# Altium PCB FMC_Test_Module.PcbDoc (part 2 of 2)
Units mm, origin at the board's own origin, x right, y up, seen from the top; angles counter-clockwise.
Board outline 34.9 x 69 mm, 4 copper layers (Top Layer, Int1 (GND), Int2 (PWR), Bottom Layer), stack 1.508 mm thick; 11 components, 88 nets, 527 pads, 220 vias.
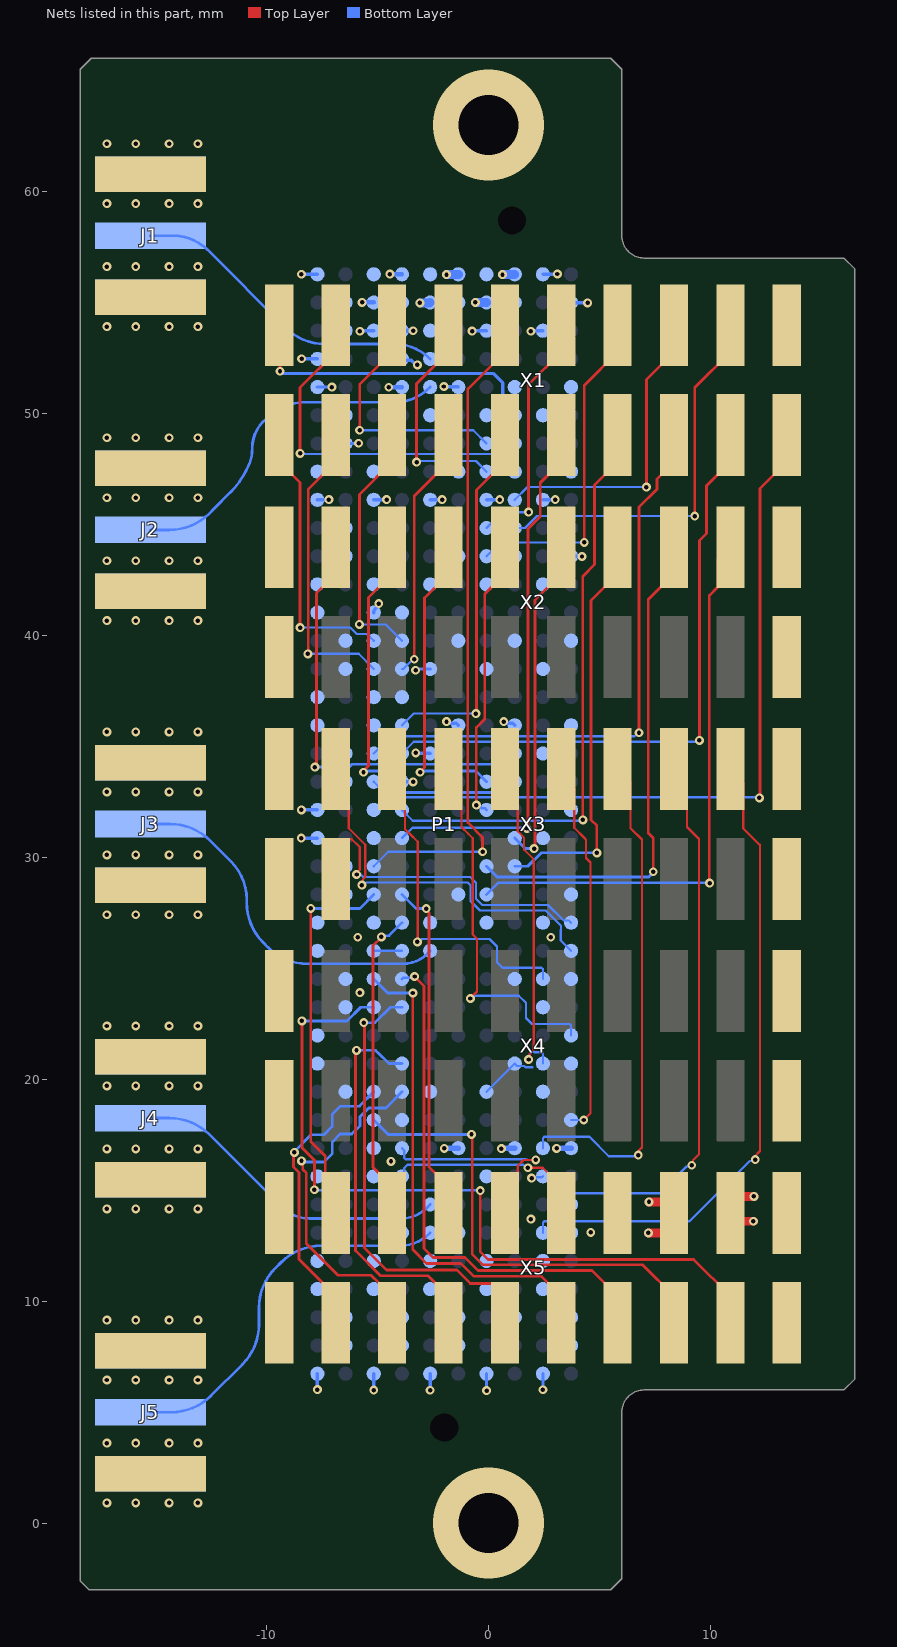
[diagram p4: the nets of this part, all layers, seen from the top]

## Via types
v1: diameter 0.4, hole 0.2, Top Layer to Bottom Layer, tented both sides, 218 vias
v2: diameter 5, hole 2.7, Top Layer to Bottom Layer, 2 vias

## Nets (pads, with @x,y where several pads share a name; then routed paths per layer and width w, separated by ;. In a path a pad name is that pad's centre, name@x,y a point inside that pad or via, vN(x,y) a via of type N, cw(c..) or ccw(c..) an arc to the next point about the centre after c; other vN are vias at no path point) (continued)
CON2_GP_D_N7: P1.K17 X3.18 | length 16.2
  Top Layer w0.1: X3.18@-6.89,29.025 X3.18@-6.725,29.19 ; v1(-5.947,29.226) -5.947,29.299 -5.811,29.435 -5.811,30.461 -6.164,30.813 -6.305,30.813 -6.325,30.793 X3.18@-6.325,30.359 ; X3.18@-6.725,29.19 -6.325,29.59 X3.18@-6.325,30.359 ; X3.18@-6.725,29.19 -6.329,30.346 X3.18@-6.325,30.359
  Bottom Layer w0.1: v1(-5.947,29.226) -5.943,29.23 -5.766,29.23 -5.646,29.11 -0.835,29.11 -0.565,28.84 -0.565,28.13 -0.505,28.07 -0.288,27.853 2.675,27.853 3.37,27.158 3.612,27.158 P1.K17@3.715,27.055
CON2_GP_D_P0: P1.J6 X3.3 | length 29.5
  Top Layer w0.1: X3.3@10.89,33.975 11.475,33.39 11.475,31.3 12.152,30.623 12.225,30.55 12.225,16.771 11.963,16.509 12.01,16.462 v1(12.01,16.379)
  Bottom Layer w0.1: P1.J6@2.445,13.085 2.445,13.541 2.504,13.6 7.177,13.6 9.054,13.6 11.775,16.322 11.952,16.322 v1(12.01,16.379)
CON2_GP_D_P1: P1.K7 X3.5 | length 24.9
  Top Layer w0.1: X3.5@8.35,33.975 8.935,33.39 8.935,31.369 9.481,30.823 9.481,16.623 9.207,16.349 9.207,16.182 v1(9.15,16.125)
  Bottom Layer w0.1: P1.K7@3.715,14.355 3.715,14.806 3.774,14.865 7.704,14.865 8.91,16.07 9.095,16.07 v1(9.15,16.125)
CON2_GP_D_P2: P1.J9 X3.7 | length 23.1
  Top Layer w0.1: X3.7@5.81,33.975 6.395,33.39 6.395,31.311 6.908,30.798 6.908,16.929 6.777,16.799 6.777,16.622 v1(6.739,16.583)
  Bottom Layer w0.1: P1.J9@2.445,16.895 2.445,17.346 2.504,17.405 4.54,17.405 5.41,16.535 6.69,16.535 v1(6.739,16.583)
CON2_GP_D_P3: P1.K10 X3.9 | length 17.1
  Top Layer w0.1: X3.9@3.27,33.975 3.855,33.39 3.855,31.327 4.315,30.867 4.388,30.793 4.388,29.965 4.59,29.764 4.59,18.47 v1(4.285,18.165)
  Bottom Layer w0.1: P1.K10@3.715,18.165 v1(4.285,18.165)
CON2_GP_D_P4: P1.J12 X3.11 | length 15.1
  Top Layer w0.1: X3.11@0.73,33.975 1.315,33.39 1.315,31.169 1.598,30.885 1.598,30.343 2.035,29.906 2.035,21.353 1.854,21.173 1.854,20.946 v1(1.8,20.891)
  Bottom Layer w0.1: v1(1.8,20.891) 1.855,20.946 1.855,21.13 1.948,21.223 2.067,21.223 2.075,21.215 2.386,21.215 2.445,21.156 P1.J12@2.445,20.705
CON2_GP_D_P5: P1.K13 X3.13 | length 17
  Top Layer w0.1: X3.13@-1.81,33.975 -1.225,33.39 -1.225,31.367 -0.923,31.065 -0.713,30.855 -0.713,26.518 -0.525,26.329 -0.525,23.957 -0.824,23.657 v1(-0.824,23.638)
  Bottom Layer w0.1: v1(-0.824,23.638) -0.743,23.638 -0.619,23.761 1.36,23.761 1.68,23.441 1.68,22.76 1.955,22.485 3.656,22.485 3.715,22.426 P1.K13@3.715,21.975
CON2_GP_D_P6: P1.J15 X3.15 | length 15.4
  Top Layer w0.1: X3.15@-4.35,33.975 -3.765,33.39 -3.765,31.27 -3.52,31.025 -3.192,30.696 -3.192,26.206 v1(-3.21,26.187)
  Bottom Layer w0.1: v1(-3.21,26.187) -3.135,26.187 -3.002,26.321 0.034,26.321 0.375,25.98 0.375,25.59 0.375,25.271 0.621,25.025 2.386,25.025 2.445,24.966 P1.J15@2.445,24.515
CON2_GP_D_P7: P1.K16 X3.17 | length 17.2
  Top Layer w0.1: X3.17@-6.89,33.975 -6.305,33.39 -6.305,31.308 -5.561,30.564 -5.561,29.117 -5.655,29.023 -5.655,28.805 v1(-5.711,28.748)
  Bottom Layer w0.1: -5.518,28.86 -0.939,28.86 -0.815,28.736 -0.815,28.027 -0.392,27.603 2.571,27.603 3.255,26.92 3.255,26.733 3.248,26.726 3.248,26.252 P1.K16@3.715,25.785
CON2_GP_S0: P1.G18 X2.3 | length 25.8
  Top Layer w0.125: v1(9.955,28.839) 9.943,28.851 9.943,41.793 10.318,42.168 10.318,43.403 X2.3@10.89,43.975
  Bottom Layer w0.125: P1.G18@-0.095,28.325 0.43,28.85 9.944,28.85 v1(9.955,28.839)
CON2_GP_S1: P1.G19 X2.5 | length 23.1
  Top Layer w0.125: v1(7.415,29.35) 7.415,30.87 7.188,31.097 7.188,41.608 8.35,42.77 X2.5@8.35,43.975
  Bottom Layer w0.125: P1.G19@-0.095,29.595 0.387,29.112 7.212,29.112 7.415,29.315 v1(7.415,29.35) v1@7.45,29.35
CON2_GP_S2: P1.H19 X2.7 | length 18.3
  Top Layer w0.125: v1(4.875,30.2) 4.875,31.425 4.612,31.688 4.612,41.572 5.81,42.77 X2.7@5.81,43.975
  Bottom Layer w0.125: P1.H19@1.175,29.595 1.763,29.595 2.368,30.2 v1(4.875,30.2)
CON2_GP_S3: P1.H20 X2.9 | length 15.2
  Top Layer w0.125: v1(2.046,30.391) 2.088,30.433 2.088,41.588 3.27,42.77 X2.9@3.27,43.975
  Bottom Layer w0.125: P1.H20@1.175,30.865 1.649,30.391 v1(2.046,30.391)
CON2_GP_S4: P1.G21 X2.11 | length 12.7
  Top Layer w0.125: v1(-0.554,32.351) -0.554,35.853 -0.176,36.231 -0.176,41.864 0.73,42.77 X2.11@0.73,43.975
  Bottom Layer w0.125: v1(-0.554,32.351) -0.502,32.299 -0.398,32.299 -0.312,32.213 -0.173,32.213 P1.G21@-0.095,32.135
CON2_GP_S5: P1.G22 X2.13 | length 13.9
  Top Layer w0.125: v1(-3.086,33.83) -3.086,33.844 -2.889,34.041 -2.889,41.691 -1.81,42.77 X2.13@-1.81,43.975
  Bottom Layer w0.125: v1(-3.086,33.83) -3.012,33.83 -2.955,33.887 -0.578,33.887 P1.G22@-0.095,33.405
CON2_GP_S6: P1.H22 X2.15 | length 18.3
  Top Layer w0.125: v1(-5.638,33.83) -5.638,33.904 -5.417,34.126 -5.417,41.703 -4.35,42.77 X2.15@-4.35,43.975
  Bottom Layer w0.125: v1(-5.638,33.83) -5.586,33.882 -5.43,33.882 -5.427,33.885 -5.377,33.885 -5.375,33.887 -4.868,33.887 -4.56,33.579 -4.56,33.195 -4.285,32.92 0.69,32.92 P1.H22@1.175,33.405
CON2_GP_S7: P1.H23 X2.17 | length 19.6
  Top Layer w0.125: v1(-7.825,34.065) -7.772,34.117 -7.772,34.261 -7.758,34.276 -7.758,41.902 -6.89,42.77 X2.17@-6.89,43.975
  Bottom Layer w0.125: v1(-7.825,34.065) -6.277,34.065 -6.15,34.192 0.692,34.192 P1.H23@1.175,34.675
CON_I2S_CLK: P1.G33 X1.13 | length 10.1
  Top Layer w0.125: v1(-3.245,47.808) -3.245,51.335 -1.81,52.77 X1.13@-1.81,53.975
  Bottom Layer w0.1: v1(-3.245,47.808) -3.202,47.85 -0.57,47.85 P1.G33@-0.095,47.375
CON_I2S_IN: P1.H34 X1.17 | length 16.3
  Top Layer w0.125: v1(-8.495,48.194) -8.5,48.199 -8.5,51.16 -6.89,52.77 X1.17@-6.89,53.975
  Bottom Layer w0.1: v1@-8.476,48.175 0.705,48.175 1.12,48.59 1.12,48.645 P1.H34@1.175,48.645
CON_I2S_OUT: P1.H35 X1.19 | length 14
  Top Layer w0.15: X1.19@-9.43,53.975 -9.4,53.945 v1(-9.4,51.9)
  Bottom Layer w0.15: v1(-9.4,51.9) -9.3,51.8 0.199,51.8 0.631,51.369 0.631,50.459 P1.H35@1.175,49.915
CON_I2S_WS: P1.G34 X1.15 | length 11.3
  Top Layer w0.125: v1(-5.812,49.238) -5.812,51.308 -4.35,52.77 X1.15@-4.35,53.975
  Bottom Layer w0.1: v1(-5.812,49.238) -0.688,49.238 P1.G34@-0.095,48.645
FMC_3V3: P1.C39 P1.D36 P1.D38 P1.D40 X5.5 | length 5.3
  Top Layer w0.4: v1(7.2,13.075) 7.915,13.075 8.35,13.51 X5.5@8.35,13.975 8.35,14.04 7.915,14.475 v1(7.225,14.475)
  Bottom Layer w0.2: v1(-5.7,55) -5.697,54.997 -5.178,54.997 P1.C39@-5.175,54.995 ; v1(-4.5,51.175) -4.495,51.18 -3.91,51.18 P1.D36@-3.905,51.185 ; v1(-4.45,56.275) -4.445,56.27 -3.91,56.27 P1.D40@-3.905,56.265 ; P1.D38@-3.905,53.725 v1(-3.4,53.725)
FMC_ADJ: P1.E39 P1.F40 P1.G39 P1.H40 X5.3 | length 4.8
  Top Layer w0.4: v1(11.925,13.6) 11.265,13.6 X5.3@10.89,13.975 10.89,14.29 11.325,14.725 v1(11.95,14.725)
  Bottom Layer w0.4: v1(-3.1,54.975) -2.655,54.975 P1.E39@-2.635,54.995 ; v1(-1.9,56.25) -1.38,56.25 P1.F40@-1.365,56.265 ; v1(-0.6,55) -0.1,55 P1.G39@-0.095,54.995 ; v1(0.625,56.25) 1.16,56.25 P1.H40@1.175,56.265
GND: J1.2 J1.3 J1.4 J1.5 J2.2 J2.3 J2.4 J2.5 J3.2 J3.3 J3.4 J3.5 J4.2 J4.3 J4.4 J4.5 J5.2 J5.3 J5.4 J5.5 P1.A1 P1.A4 P1.A5 P1.A8 P1.A12 P1.A13 P1.A16 P1.A17 P1.A20 P1.A21 P1.A24 P1.A25 P1.A28 P1.A29 P1.A32 P1.A33 P1.A36 P1.A37 P1.A40 P1.B2 P1.B3 P1.B11 P1.B14 P1.B15 P1.B18 P1.B19 P1.B22 P1.B23 P1.B26 P1.B27 P1.B30 P1.B31 P1.B34 P1.B35 P1.B38 P1.B39 P1.C1 P1.C4 P1.C5 P1.C8 P1.C9 P1.C16 P1.C17 P1.C20 P1.C21 P1.C24 P1.C25 P1.C28 P1.C29 P1.C32 P1.C33 P1.C38 P1.C40 P1.D2 P1.D3 P1.D6 P1.D10 P1.D16 P1.D22 P1.D25 P1.D28 P1.D37 P1.D39 P1.E1 P1.E4 P1.E5 P1.E11 P1.E17 P1.E23 P1.E26 P1.E29 P1.E32 P1.E35 P1.E38 P1.E40 P1.F2 P1.F3 P1.F6 P1.F9 P1.F18 P1.F24 P1.F27 P1.F30 P1.F33 P1.F36 P1.F39 P1.G1 P1.G4 P1.G5 P1.G8 P1.G11 P1.G17 P1.G26 P1.G29 P1.G32 P1.G35 P1.G38 P1.G40 P1.H3 P1.H9 P1.H12 P1.H15 P1.H24 P1.H27 P1.H30 P1.H33 P1.H36 P1.H39 P1.J1 P1.J4 P1.J5 P1.J8 P1.J11 P1.J14 P1.J17 P1.J20 P1.J23 P1.J26 P1.J29 P1.J32 P1.J35 P1.J38 P1.J40 P1.K2 P1.K3 P1.K6 P1.K9 P1.K12 P1.K15 P1.K18 P1.K21 P1.K24 P1.K27 P1.K30 P1.K33 P1.K36 P1.K39 X1.1 X2.1 X2.2 X2.19 X2.20 X3.1 X3.2 X3.19 X3.20 X4.1 X4.2 X4.19 X4.20 X5.1 X5.2 X5.7 X5.19 X5.20 | length 26.3
  Bottom Layer w0.1: P1.C16@-5.175,25.785 P1.D16@-3.905,25.785 ; P1.G11@-0.095,19.435 P1.H12@1.175,20.705 1.278,20.602 1.594,20.602 1.655,20.541 1.97,20.541 1.975,20.545 ; v1@1.896,15.5 v1(1.939,15.543) 1.98,15.584 2.404,15.584 P1.J8@2.445,15.625
  Bottom Layer w0.15: v1(-8.441,30.865) P1.A20@-7.715,30.865 ; v1@-8.439,56.266 P1.A40@-7.716,56.266 ; v1(-8.435,32.135) P1.A21@-7.715,32.135 ; v1(-8.428,52.46) -8.425,52.457 -7.717,52.457 P1.A37@-7.715,52.455 ; v1(-7.715,6.015) P1.A1@-7.715,6.735 ; P1.A32@-7.715,46.105 -7.205,46.105 -7.2,46.1 v1(-7.2,46.115) ; P1.A36@-7.715,51.185 v1(-7.065,51.185) v1@-7.015,51.185 ; P1.B34@-6.445,48.645 -5.883,48.645 ccw(c-5.883,48.681) v1(-5.858,48.656) ; v1(-5.8,53.7) cw(c-5.74,53.64) -5.74,53.725 P1.C38@-5.175,53.725 ; v1(-5.175,5.997) P1.C1@-5.175,6.735 ; P1.C28@-5.175,41.025 cw(c-4.934,41.025) -5.104,41.196 -4.9,41.4 -4.922,41.4 v1(-4.954,41.432) ; P1.C32@-5.175,46.105 -4.605,46.105 -4.6,46.1 v1(-4.6,46.115) ; P1.D22@-3.905,33.405 -3.903,33.402 -3.403,33.402 v1(-3.4,33.4) ; P1.D37@-3.905,52.455 -3.846,52.396 -3.493,52.396 -3.278,52.181 v1(-3.21,52.181) ; v1(-3.288,38.429) -3.319,38.461 -3.351,38.461 cw(c-3.293,38.403) -3.293,38.485 P1.E26@-2.635,38.485 ; v1(-3.286,34.701) -3.273,34.688 -2.648,34.688 P1.E23@-2.635,34.675 ; v1(-2.635,5.988) P1.E1@-2.635,6.735 ; P1.E32@-2.635,46.105 -2.105,46.105 -2.1,46.1 v1(-2.1,46.115) ; v1(-2.015,51.211) -2.002,51.198 -1.378,51.198 P1.F36@-1.365,51.185 ; v1(-1.9,36.115) -1.832,36.115 -1.756,36.039 -1.459,36.039 P1.F24@-1.365,35.945 ; v1(-0.743,53.708) -0.734,53.717 -0.103,53.717 P1.G38@-0.095,53.725 ; v1(-0.095,5.971) P1.G1@-0.095,6.735 ; P1.G32@-0.095,46.105 0.495,46.105 0.5,46.1 v1(0.5,46.115) ; v1(0.678,36.115) 0.746,36.115 0.822,36.039 1.081,36.039 P1.H24@1.175,35.945 ; v1(1.9,53.7) cw(c1.96,53.64) 1.96,53.725 P1.J38@2.445,53.725 ; v1(2.445,6.009) P1.J1@2.445,6.735 ; P1.J32@2.445,46.105 2.995,46.105 3,46.1 v1(3,46.115) ; P1.J40@2.445,56.265 2.453,56.273 3.088,56.273 v1(3.095,56.28) ; v1(2.8,26.4) v1@2.9,26.5 ; P1.K30@3.715,43.565 3.79,43.49 3.858,43.558 4.198,43.558 v1(4.205,43.551) ; P1.K39@3.715,54.995 3.722,54.988 4.45,54.988 v1(4.457,54.981)
  Bottom Layer w0.25: v1(-2,16.885) -2,16.895 P1.F9@-1.365,16.895 ; v1(0.572,16.873) 0.572,16.895 P1.H9@1.175,16.895 ; v1(3.065,16.885) 3.075,16.895 P1.K9@3.715,16.895
  other v1: -17.2,0.91 -15.9,0.91 -14.4,0.91 -13.1,0.91 -17.2,3.61 -15.9,3.61 -14.4,3.61 -13.1,3.61 -17.2,6.45 -15.9,6.45 -14.4,6.45 -13.1,6.45 -17.2,9.15 -15.9,9.15 -14.4,9.15 -13.1,9.15 4.6,13.1 1.9,13.7 -17.2,14.16 -15.9,14.16 -14.4,14.16 -13.1,14.16 -4.4,16.3 -17.2,16.86 -15.9,16.86 -14.4,16.86 -13.1,16.86 -17.2,19.7 -15.9,19.7 -14.4,19.7 -13.1,19.7 -17.2,22.4 -15.9,22.4 -14.4,22.4 -13.1,22.4 -5.8,23.9 -5.9,26.4 -17.2,27.41 -15.9,27.41 -14.4,27.41 -13.1,27.41 -17.2,30.11 -15.9,30.11 -14.4,30.11 -13.1,30.11 -17.2,32.95 -15.9,32.95 -14.4,32.95 -13.1,32.95 -17.2,35.65 -15.9,35.65 -14.4,35.65 -13.1,35.65 -17.2,40.66 -15.9,40.66 -14.4,40.66 -13.1,40.66 -17.2,43.36 -15.9,43.36 -14.4,43.36 -13.1,43.36 -17.2,46.2 -15.9,46.2 -14.4,46.2 -13.1,46.2 -17.2,48.9 -15.9,48.9 -14.4,48.9 -13.1,48.9 -17.2,53.91 -15.9,53.91 -14.4,53.91 -13.1,53.91 -8.44,56.266 -17.2,56.61 -15.9,56.61 -14.4,56.61 -13.1,56.61 -17.2,59.45 -15.9,59.45 -14.4,59.45 -13.1,59.45 -17.2,62.15 -15.9,62.15 -14.4,62.15 -13.1,62.15
  other v2: 0,0 0,63
HYPER_CK_N: P1.D9 X5.11 | length 9.7
  Top Layer w0.1: X5.11@0.73,13.975 1.315,14.56 1.315,16.107 1.574,16.366 v1(2.121,16.366)
  Bottom Layer w0.1: P1.D9@-3.905,16.895 -3.802,16.792 -3.802,16.452 -3.743,16.394 -3.719,16.394 1.663,16.394 1.688,16.369 1.735,16.369 1.737,16.366 v1(2.121,16.366)
HYPER_CK_P: P1.D8 X5.9 | length 10
  Top Layer w0.1: v1(1.768,16.013) 2.437,16.013 3.27,15.18 X5.9@3.27,13.975 X5.9@2.685,14.56
  Bottom Layer w0.1: P1.D8@-3.905,15.625 -3.802,15.728 -3.802,16.003 -3.661,16.144 1.559,16.144 1.69,16.013 v1(1.768,16.013)
HYPER_CSN0: P1.D18 X5.13 | length 15.5
  Top Layer w0.125: v1(-2.811,27.692) -2.811,27.635 -2.685,27.509 -2.685,16.055 -1.81,15.18 X5.13@-1.81,13.975
  Bottom Layer w0.125: P1.D18@-3.905,28.325 -3.272,27.692 v1(-2.811,27.692)
HYPER_CSN1: P1.D17 X5.15 | length 14.1
  Top Layer w0.125: v1(-4.83,26.416) -4.83,26.395 -5.208,26.017 -5.208,16.038 -4.35,15.18 X5.15@-4.35,13.975
  Bottom Layer w0.125: v1(-4.83,26.416) -4.778,26.469 -4.491,26.469 P1.D17@-3.905,27.055
HYPER_D0: P1.C14 X5.4 | length 34.9
  Top Layer w0.125: v1(-8.416,22.63) -8.414,22.628 -8.414,16.915 -7.851,16.352 v1(-7.851,15.02) ; v1(-0.381,14.98) -0.383,14.978 -0.383,12.244 -0.023,11.884 9.236,11.884 10.89,10.23 X5.4@10.89,9.025
  Bottom Layer w0.125: v1(-8.416,22.63) -6.378,22.63 -5.763,23.245 P1.C14@-5.175,23.245 ; v1(-7.851,15.02) -7.831,15 -0.401,15 v1(-0.381,14.98)
HYPER_D1: P1.C10 X5.6 | length 21.2
  Top Layer w0.125: v1(-0.773,17.514) -0.743,17.484 -0.743,12.123 -0.259,11.638 6.942,11.638 8.35,10.23 X5.6@8.35,9.025
  Bottom Layer w0.125: P1.C10@-5.175,18.165 -4.524,17.514 v1(-0.773,17.514)
HYPER_D2: P1.D15 X5.8 | length 23.9
  Top Layer w0.125: v1(-3.333,24.628) -2.91,24.205 -2.91,12.37 -2.512,11.972 -1.071,11.972 -0.482,11.383 4.657,11.383 5.81,10.23 X5.8@5.81,9.025
  Bottom Layer w0.125: P1.D15@-3.905,24.515 -3.845,24.575 -3.385,24.575 v1(-3.333,24.628)
HYPER_D3: P1.C15 X5.10 | length 22.3
  Top Layer w0.125: v1(-3.415,23.885) -3.415,12.319 -2.796,11.7 -1.245,11.7 -0.666,11.121 2.379,11.121 2.698,10.803 2.698,9.597 X5.10@3.27,9.025
  Bottom Layer w0.125: P1.C15@-5.175,24.515 -4.545,23.885 v1(-3.415,23.885)
HYPER_D4: P1.D14 X5.12 | length 20.6
  Top Layer w0.125: v1(-5.625,22.55) -5.592,22.517 -5.592,12.391 -4.601,11.4 -1.423,11.4 -0.826,10.802 0.158,10.802 0.73,10.23 X5.12@0.73,9.025
  Bottom Layer w0.125: v1(-5.625,22.55) -5.118,22.55 -4.423,23.245 P1.D14@-3.905,23.245
HYPER_D5: P1.D12 X5.14 | length 17.6
  Top Layer w0.125: v1(-5.955,21.303) -6,21.258 -6,12.278 -4.869,11.148 -2.728,11.148 -1.81,10.23 X5.14@-1.81,9.025
  Bottom Layer w0.125: v1(-5.955,21.303) -5.092,21.303 -4.977,21.187 -4.975,21.187 -4.493,20.705 P1.D12@-3.905,20.705
HYPER_D6: P1.D11 X5.16 | length 16.3
  Top Layer w0.125: v1(-8.431,16.325) -8.378,16.272 -8.378,15.947 -8.214,15.782 -8.214,12.589 -6.795,11.17 -5.292,11.17 -4.925,10.802 -4.922,10.802 -4.35,10.23 X5.16@-4.35,9.025
  Bottom Layer w0.125: v1(-8.431,16.325) -8.381,16.275 -7.421,16.275 -7.042,16.654 -7.042,17.177 -6.689,17.53 -6.172,17.53 -5.8,17.902 -5.8,18.311 -5.4,18.711 -4.629,18.711 P1.D11@-3.905,19.435
HYPER_D7: P1.C11 X5.18 | length 13.5
  Top Layer w0.125: v1(-8.755,16.706) -8.794,16.667 -8.794,16.043 -8.55,15.8 -8.55,11.89 -6.89,10.23 X5.18@-6.89,9.025
  Bottom Layer w0.125: v1(-8.755,16.706) -8.755,16.745 -8,17.5 -7.421,17.5 -7.05,17.871 -7.05,18.411 -6.674,18.786 -5.824,18.786 P1.C11@-5.175,19.435
HYPER_RWDS: P1.C18 X5.17 | length 17.3
  Top Layer w0.125: v1(-8.017,27.697) -8.017,17.191 -7.357,16.531 -7.357,14.442 X5.17@-6.89,13.975
  Bottom Layer w0.125: v1(-8.017,27.697) -5.803,27.697 P1.C18@-5.175,28.325
I2C/SMBus_nALERT: P1.C19 X1.11 | length 29.9
  Top Layer w0.125: v1(-0.275,30.25) -0.275,30.9 -0.938,31.563 -0.938,51.102 0.73,52.77 X1.11@0.73,53.975
  Bottom Layer w0.1: P1.C19@-5.175,29.595 -4.52,30.25 v1(-0.275,30.25)
I2C/SMBus_SCL: P1.G30 X1.7 | length 15.1
  Top Layer w0.125: v1(4.31,44.189) 4.31,51.27 5.81,52.77 X1.7@5.81,53.975
  Bottom Layer w0.1: P1.G30@-0.095,43.565 0.529,44.189 v1(4.31,44.189)
I2C/SMBus_SDA: P1.G31 X1.9 | length 11.2
  Top Layer w0.125: v1(1.8,45.55) 1.8,51.3 3.27,52.77 X1.9@3.27,53.975
  Bottom Layer w0.1: P1.G31@-0.095,44.835 0.62,45.55 v1(1.8,45.55)
I2C_SCL: P1.D26 X1.14 | length 11.5
  Top Layer w0.125: v1(-3.35,38.925) -3.35,46.28 -1.81,47.82 X1.14@-1.81,49.025
  Bottom Layer w0.1: P1.D26@-3.905,38.485 -3.848,38.485 -3.408,38.925 v1(-3.35,38.925)
I2C_SDA: P1.D27 X1.16 | length 11.4
  Top Layer w0.125: v1(-5.82,40.491) -5.82,46.35 -4.35,47.82 X1.16@-4.35,49.025
  Bottom Layer w0.1: v1(-5.82,40.491) -4.641,40.491 P1.D27@-3.905,39.755
I2S_CLK: P1.C26 X1.18 | length 13.6
  Top Layer w0.125: v1(-8.144,39.167) -8.132,39.178 -8.132,46.577 -6.89,47.82 X1.18@-6.89,49.025
  Bottom Layer w0.1: v1(-8.144,39.167) -5.857,39.167 P1.C26@-5.175,38.485
I2S_OUT: P1.C27 X1.20 | length 12.6
  Top Layer w0.125: X1.20@-9.43,49.025 -9.43,47.82 -8.495,46.885 v1(-8.495,40.349)
  Bottom Layer w0.1: v1(-8.495,40.349) -8.494,40.35 -6.232,40.35 -5.946,40.064 -5.484,40.064 P1.C27@-5.175,39.755
NetJ1_1: J1.1 P1.E37 | length 14.6
  Bottom Layer w0.125: J1.1@-15.24,58 -14.184,58 cw(c-14.184,55.866) -12.675,57.375 -9.169,53.869 ccw(c-7.373,55.665) -7.373,53.125 -4.253,53.125 cw(c-4.253,50.837) P1.E37@-2.635,52.455
NetJ2_1: J2.1 P1.E36 | length 15.8
  Bottom Layer w0.125: J2.1@-15.24,44.75 -14.377,44.75 ccw(c-14.377,47.29) -12.581,45.494 -12.387,45.688 -11.645,46.43 ccw(c-14.421,49.206) -10.768,47.767 ccw(c-12.294,48.368) -10.655,48.424 cw(c-10.53,48.427) -10.655,48.427 ; -10.655,48.428 cw(c-8.95,48.426) -9.986,49.78 cw(c-8.248,48.041) -8.248,50.5 -4.225,50.5 ccw(c-4.225,52.685) -2.68,51.14 P1.E36@-2.635,51.185
NetJ3_1: J3.1 P1.E16 | length 16.2
  Bottom Layer w0.125: J3.1@-15.24,31.5 -14.352,31.5 cw(c-14.352,28.96) -12.556,30.756 -11.607,29.807 cw(c-13.314,28.1) -10.9,28.1 -10.9,27.952 ccw(c-8.36,27.952) -10.156,26.156 -9.944,25.944 ccw(c-8.148,27.74) -8.668,25.254 ccw(c-8.148,27.74) -8.148,25.2 -3.875,25.2 ccw(c-3.875,26.781) -2.757,25.663 P1.E16@-2.635,25.785
NetJ4_1: J4.1 P1.E7 | length 14.5
  Bottom Layer w0.125: J4.1@-15.24,18.25 -14.377,18.25 cw(c-14.377,15.71) -12.581,17.506 -9.314,14.239 ccw(c-8.073,15.48) -8.073,13.725 -3.95,13.725 ccw(c-3.95,15.379) -2.781,14.209 P1.E7@-2.635,14.355
NetJ5_1: J5.1 P1.E6 | length 17.1
  Bottom Layer w0.125: J5.1@-15.24,5 -14.302,5 ccw(c-14.302,7.54) -12.506,5.744 -11.094,7.156 ccw(c-12.89,8.952) -10.35,8.952 -10.35,9.698 cw(c-7.81,9.698) -9.606,11.494 -9.344,11.756 cw(c-7.548,9.96) -7.548,12.5 -4,12.5 ccw(c-4,14.383) -2.668,13.052 P1.E6@-2.635,13.085
QSPI_IO0: P1.C23 X1.6 | length 26.4
  Top Layer w0.125: v1(6.775,35.613) 6.775,45.776 7.579,46.58 7.579,47.049 8.35,47.82 X1.6@8.35,49.025
  Bottom Layer w0.1: P1.C23@-5.175,34.675 -4.399,35.451 6.566,35.451 6.729,35.613 v1(6.775,35.613)
QSPI_IO1: P1.D21 X1.8 | length 26.4
  Top Layer w0.125: v1(4.247,31.686) 4.244,31.689 4.244,42.662 4.769,43.187 4.769,46.779 5.81,47.82 X1.8@5.81,49.025
  Bottom Layer w0.1: P1.D21@-3.905,32.135 -3.418,31.648 4.209,31.648 v1(4.247,31.686)
QSPI_IO2: P1.D20 X1.10 | length 24.2
  Top Layer w0.125: v1(1.726,31.298) 1.775,31.347 1.775,44.8 2.325,45.35 2.325,46.875 3.27,47.82 X1.10@3.27,49.025
  Bottom Layer w0.1: P1.D20@-3.905,30.865 -3.435,31.335 1.689,31.335 v1(1.726,31.298)
QSPI_IO3: P1.D24 X1.12 | length 16.6
  Top Layer w0.125: v1(-0.575,36.475) -0.55,36.5 -0.55,46.54 0.73,47.82 X1.12@0.73,49.025
  Bottom Layer w0.1: P1.D24@-3.905,35.945 -3.375,36.475 v1(-0.575,36.475)
QSPI_nCS: P1.C22 X1.2 | length 34.5
  Top Layer w0.125: v1@12.225,32.659 12.225,46.615 13.43,47.82 X1.2@13.43,49.025
  Bottom Layer w0.1: P1.C22@-5.175,33.405 -4.477,32.707 12.168,32.707 v1(12.2,32.675)
QSPI_SCK: P1.D23 X1.4 | length 28
  Top Layer w0.125: v1(9.497,35.263) 9.497,44.269 9.811,44.583 9.811,46.741 10.89,47.82 X1.4@10.89,49.025
  Bottom Layer w0.1: P1.D23@-3.905,34.675 -3.372,35.208 9.441,35.208 v1(9.497,35.263)
UART_RX: P1.H31 X1.3 | length 17.6
  Top Layer w0.125: v1(9.285,45.373) 9.285,51.165 10.89,52.77 X1.3@10.89,53.975
  Bottom Layer w0.1: P1.H31@1.175,44.835 1.639,44.835 2.177,45.373 v1(9.285,45.373)
UART_TX: P1.H32 X1.5 | length 14
  Top Layer w0.125: v1(7.106,46.681) 7.106,51.526 8.35,52.77 X1.5@8.35,53.975
  Bottom Layer w0.1: P1.H32@1.175,46.105 1.751,46.681 v1(7.106,46.681)
pads on no net: P1.A2 P1.A3 P1.A6 P1.A7 P1.A9 P1.A10 P1.A11 P1.A14 P1.A15 P1.A18 P1.A19 P1.A22 P1.A23 P1.A26 P1.A27 P1.A30 P1.A31 P1.A34 P1.A35 P1.A38 P1.A39 P1.B1 P1.B4 P1.B5 P1.B6 P1.B7 P1.B8 P1.B9 P1.B10 P1.B12 P1.B13 P1.B16 P1.B17 P1.B20 P1.B21 P1.B24 P1.B25 P1.B28 P1.B29 P1.B32 P1.B33 P1.B36 P1.B37 P1.B40 P1.C2 P1.C3 P1.C6 P1.C7 P1.C12 P1.C13 P1.C30 P1.C31 P1.C34 P1.C35 P1.C36 P1.C37 P1.D1 P1.D4 P1.D5 P1.D7 P1.D13 P1.D19 P1.D29 P1.D30 P1.D31 P1.D32 P1.D33 P1.D34 P1.D35 P1.E2 P1.E3 P1.E8 P1.E9 P1.E10 P1.E12 P1.E13 P1.E14 P1.E15 P1.E18 P1.E19 P1.E20 P1.E21 P1.E22 P1.E24 P1.E25 P1.E27 P1.E28 P1.E30 P1.E31 P1.E33 P1.E34 P1.F1 P1.F4 P1.F5 P1.F7 P1.F8 P1.F10 P1.F11 P1.F12 P1.F13 P1.F14 P1.F15 P1.F16 P1.F17 P1.F19 P1.F20 P1.F21 P1.F22 P1.F23 P1.F25 P1.F26 P1.F28 P1.F29 P1.F31 P1.F32 P1.F34 P1.F35 P1.F37 P1.F38 P1.G2 P1.G3 P1.G14 P1.G20 P1.G23 P1.G36 P1.G37 P1.H1 P1.H2 P1.H4 P1.H5 P1.H6 P1.H18 P1.H21 P1.H37 P1.H38 P1.J2 P1.J3 P1.J18 P1.J19 P1.J21 P1.J22 P1.J24 P1.J25 P1.J27 P1.J28 P1.J30 P1.J31 P1.J33 P1.J34 P1.J36 P1.J37 P1.J39 P1.K1 P1.K4 P1.K5 P1.K19 P1.K20 P1.K22 P1.K23 P1.K25 P1.K26 P1.K28 P1.K29 P1.K31 P1.K32 P1.K34 P1.K35 P1.K37 P1.K38 P1.K40 P1.MH1 P1.MH2

## Polygon pours and split planes (outlines as drawn)
GND on Bottom Layer "NONET_L-01_P-001" (solid, remove dead copper, pour order 1): 16.664,-2.942 16.664,67.058 -18.736,67.058 -18.736,-2.942
GND on Top Layer "NONET_L-01_P-001" (solid, remove dead copper, pour order 0): 17,-3 17,67 -18.4,67 -18.4,-3
FMC_3V3 on Int2 (PWR) (split plane): 5.49,65.289 5.49,58 5.491,57.988 5.49,57.975 5.495,57.877 5.5,57.84 5.504,57.802 5.542,57.61 5.571,57.514 5.646,57.333 5.668,57.292 5.694,57.245 5.721,57.204 -2.755,57.204 -2.804,57.195 -2.846,57.167 -3.527,56.486 -3.555,56.444 -3.565,56.394 -3.565,54.789 -3.555,54.739 -3.527,54.697 -2.988,54.158 -2.946,54.13 -2.897,54.121 9.771,54.121 13.521,50.371 13.521,16.104 13.346,15.929 11.875,15.929 11.825,15.92 11.783,15.892 11.233,15.342 11.205,15.3 11.196,15.25 11.196,13.025 11.205,12.975 11.233,12.933 12.233,11.933 12.275,11.905 12.325,11.896 15.99,11.896 15.99,6.711 15.789,6.51 7,6.51 6.988,6.509 6.975,6.51 6.877,6.505 6.84,6.5 6.802,6.496 6.61,6.458 6.514,6.429 6.333,6.354 6.292,6.332 6.245,6.306 6.082,6.197 6.055,6.175 6.005,6.134 5.866,5.995 5.827,5.948 5.803,5.918 5.694,5.755 5.668,5.708 5.646,5.667 5.571,5.486 5.542,5.39 5.504,5.198 5.5,5.16 5.495,5.123 5.49,5.025 5.491,5.012 5.49,5 5.49,-2.289 5.289,-2.49 -17.789,-2.49 -17.89,-2.389 -17.89,65.289 -17.689,65.49 5.289,65.49
FMC_ADJ on Int2 (PWR) (split plane): 6.005,56.866 6.057,56.823 6.082,56.803 6.245,56.694 6.321,56.653 6.333,56.646 6.514,56.571 6.61,56.542 6.802,56.504 6.84,56.5 6.877,56.495 6.975,56.49 6.987,56.491 7,56.49 15.789,56.49 15.99,56.289 15.99,12.154 12.379,12.154 11.454,13.079 11.454,15.196 11.929,15.671 13.4,15.671 13.45,15.68 13.492,15.708 13.742,15.958 13.77,16 13.779,16.05 13.779,50.425 13.77,50.475 13.742,50.517 9.917,54.342 9.875,54.37 9.825,54.379 -2.843,54.379 -3.306,54.843 -3.306,56.34 -2.701,56.946 5.925,56.946
GND on Int1 (GND) (split plane): 5.49,65.289 5.49,58 5.491,57.988 5.49,57.975 5.495,57.877 5.5,57.84 5.504,57.802 5.542,57.61 5.571,57.514 5.646,57.333 5.668,57.292 5.694,57.245 5.803,57.082 5.83,57.048 5.866,57.005 6.005,56.866 6.057,56.823 6.082,56.803 6.245,56.694 6.321,56.653 6.333,56.646 6.514,56.571 6.61,56.542 6.802,56.504 6.84,56.5 6.877,56.495 6.975,56.49 6.987,56.491 7,56.49 15.789,56.49 15.99,56.289 15.99,6.711 15.789,6.51 7,6.51 6.988,6.509 6.975,6.51 6.877,6.505 6.84,6.5 6.802,6.496 6.61,6.458 6.514,6.429 6.333,6.354 6.292,6.332 6.245,6.306 6.082,6.197 6.055,6.175 6.005,6.134 5.866,5.995 5.827,5.948 5.803,5.918 5.694,5.755 5.668,5.708 5.646,5.667 5.571,5.486 5.542,5.39 5.504,5.198 5.5,5.16 5.495,5.123 5.49,5.025 5.491,5.012 5.49,5 5.49,-2.289 5.289,-2.49 -17.789,-2.49 -17.89,-2.389 -17.89,65.289 -17.689,65.49 5.289,65.49

## Other copper
Top Layer:
  text "1" at 5.125,-0.55 h0.5 r90
  text "top" at 5.058,-2.15 h0.5 r90
Bottom Layer:
  text "bot" at 5.067,3.475 h0.5 r90
  text "4" at 5.125,1.95 h0.5 r90
Int1 (GND) (plane layer: these items are gaps in the copper):
  text "2" at 5.125,0.05 h0.5 r90
Int2 (PWR) (plane layer: these items are gaps in the copper):
  lines w0.254: 6.678,57.075 -2.755,57.075 -3.436,56.394 -3.436,54.789 -2.897,54.25 4.6,54.25 9.825,54.25 13.65,50.425 13.65,16.05 13.4,15.8 11.875,15.8 11.325,15.25 11.325,13.025 12.325,12.025 16.55,12.025
  text "3" at 5.125,0.85 h0.5 r90

## Silkscreen, mask and mechanical layers (free items; w line width, h text height)
Top Overlay:
  text "1" at 16.246,46.534 h2 r90
  text "2" at 16.228,36.579 h2 r90
  text "3" at 16.28,26.398 h2 r90
  text "4" at 16.276,16.598 h2 r90
  text "5" at 16.276,6.653 h2 r90
Bottom Overlay:
  text "Ver.:A" at -3.3,0.6 h1.5
  text "02.2021" at -3.3,-1.65 h1.5
Mechanical 4:
  the board outline again, w0